# Altium PCB STM32F4_BerkwareDevBoard.PcbDoc
Units mm, origin at the board's own origin, x right, y up, seen from the top; angles counter-clockwise.
Board outline 36.4 x 56.4 mm, 4 copper layers (Top Layer, Int1 (GND), Int2 (PWR), Bottom Layer), stack 1.586 mm thick; 46 components, 47 nets, 211 pads, 266 vias.
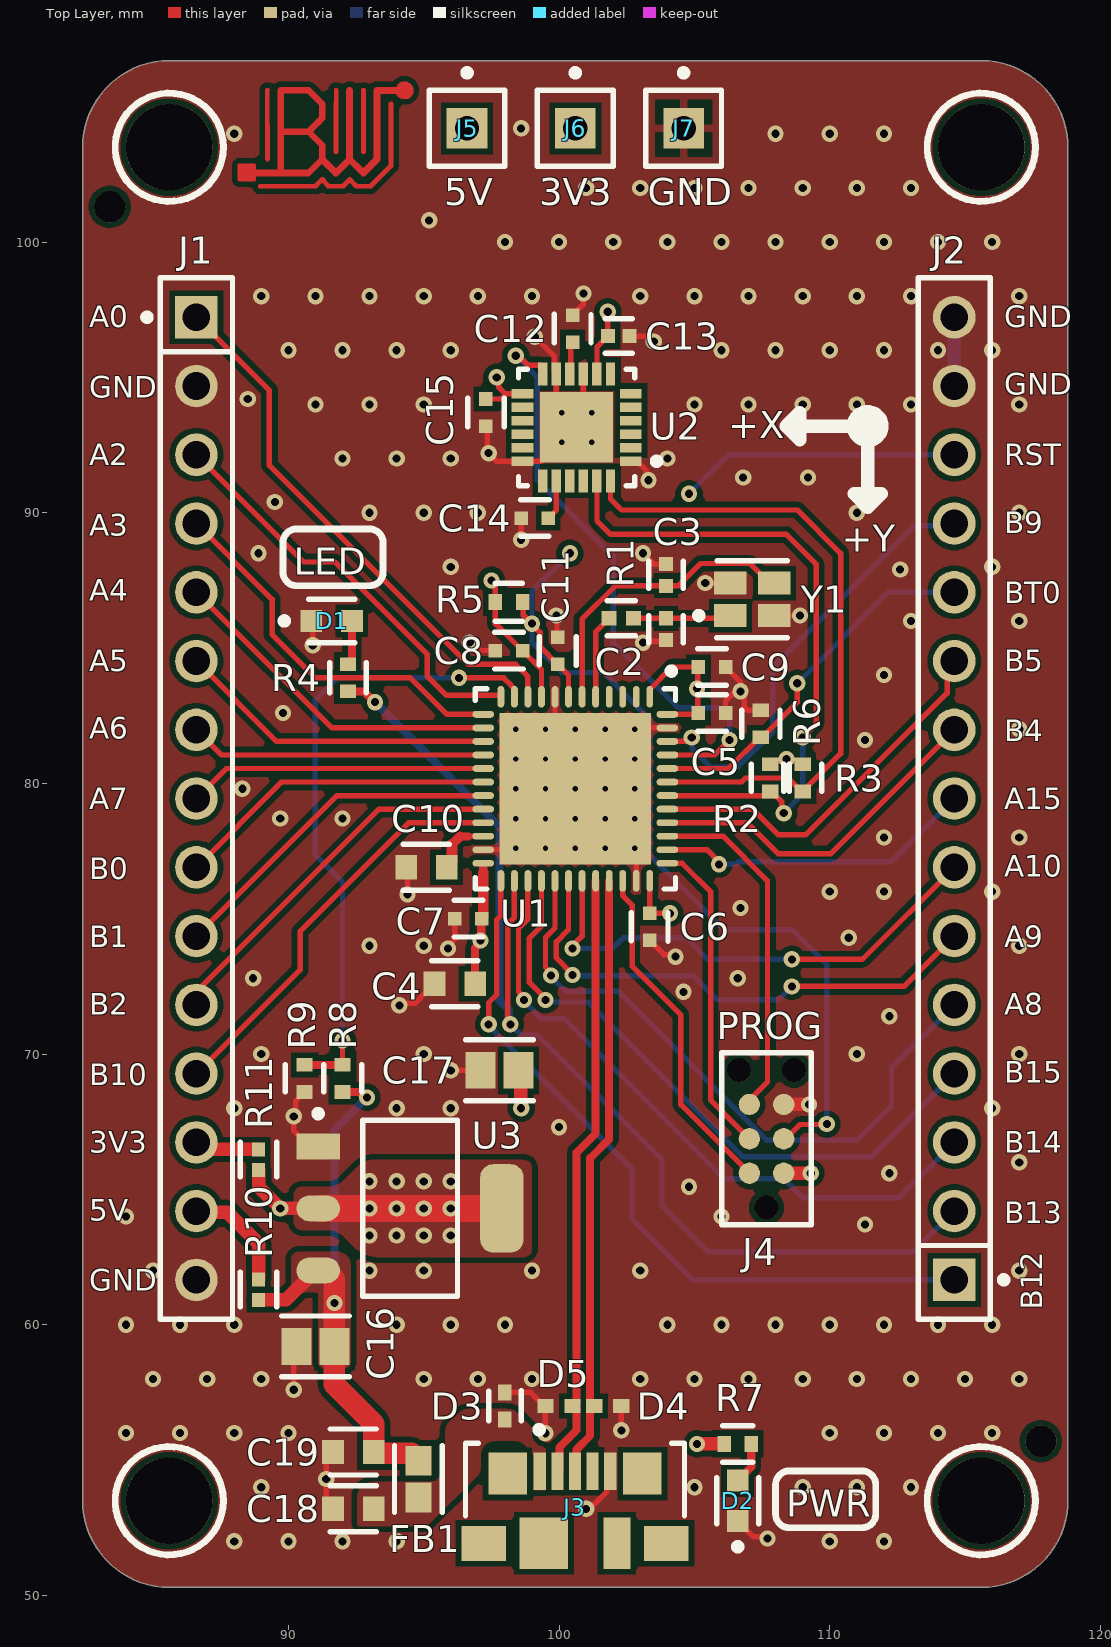
[diagram p0: Top Layer view]
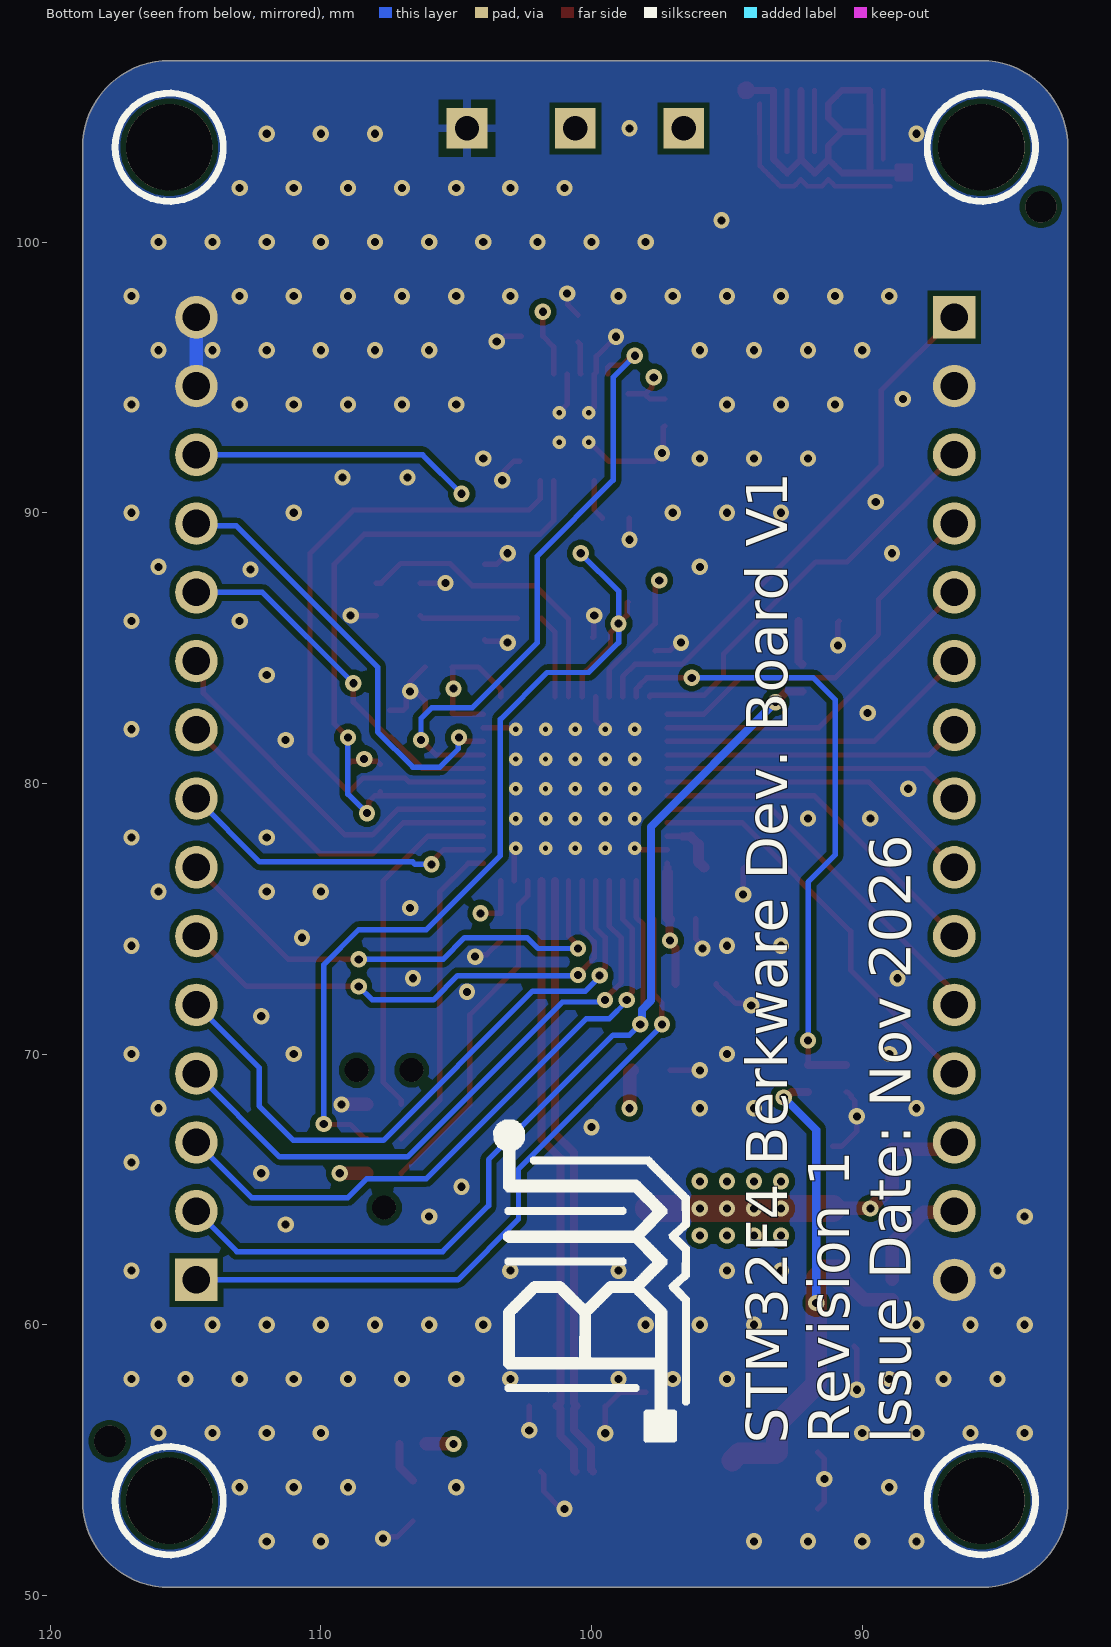
[diagram p1: Bottom Layer view, seen from below]
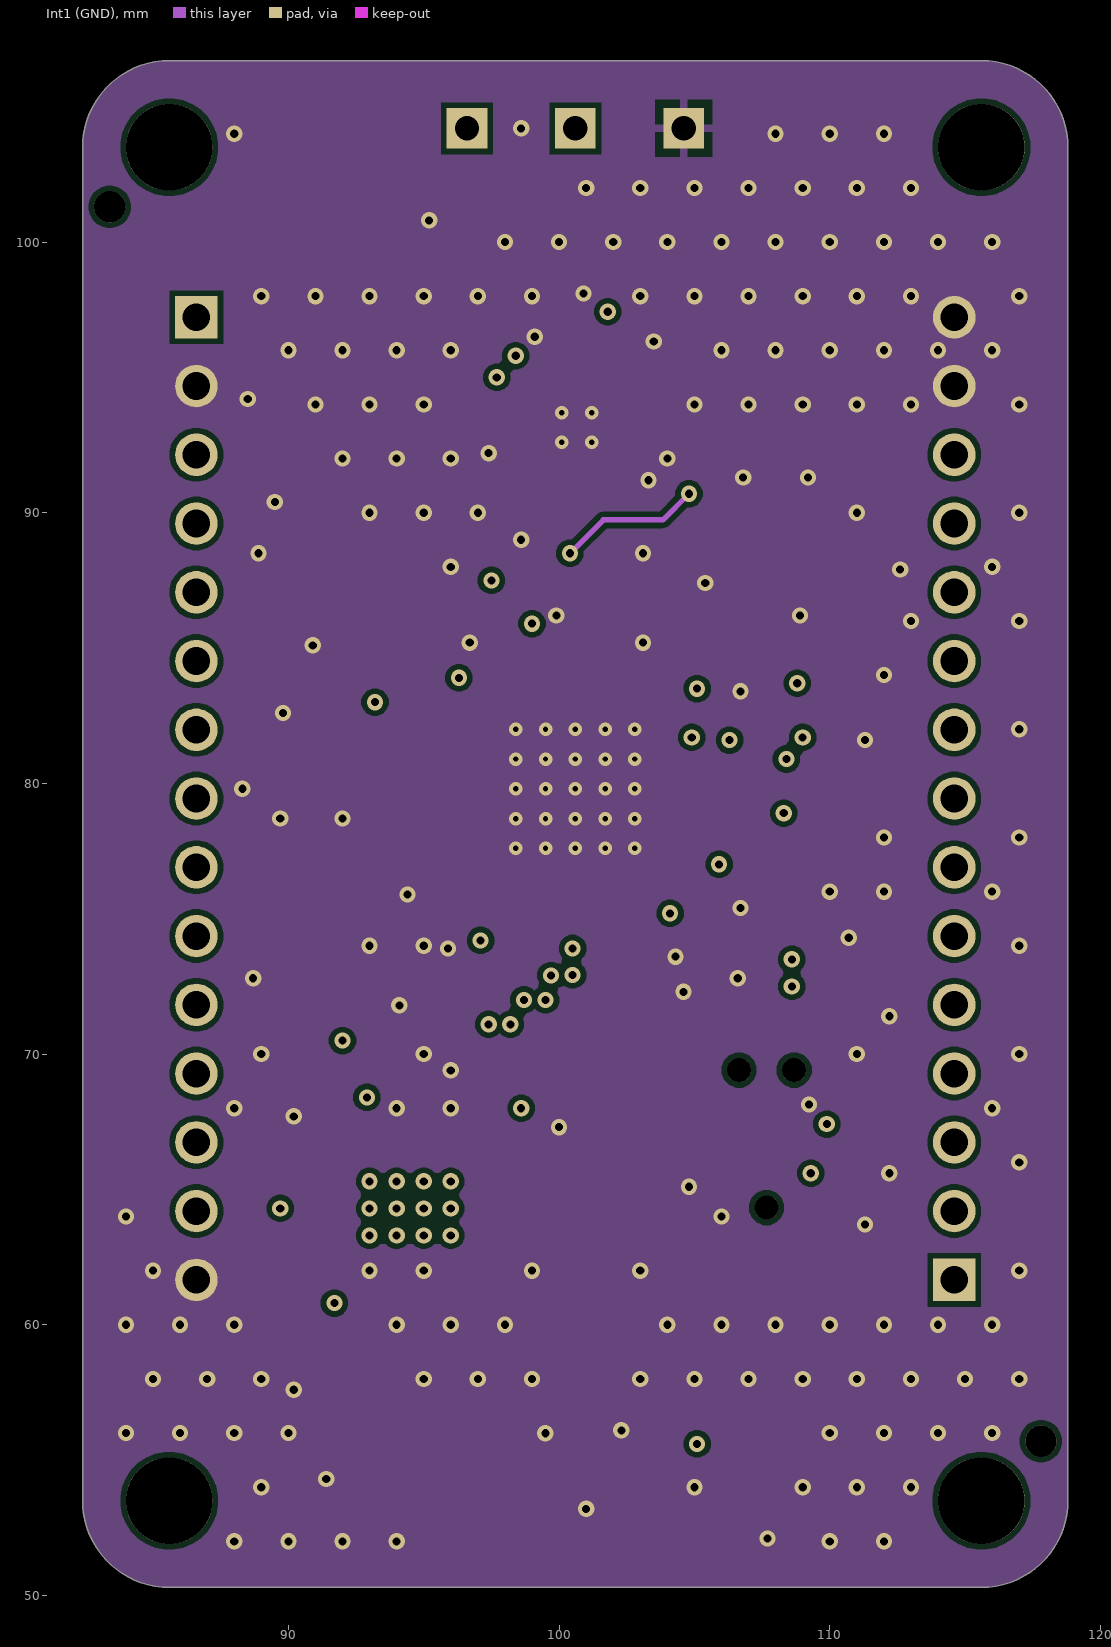
[diagram p2: Int1 (GND)]
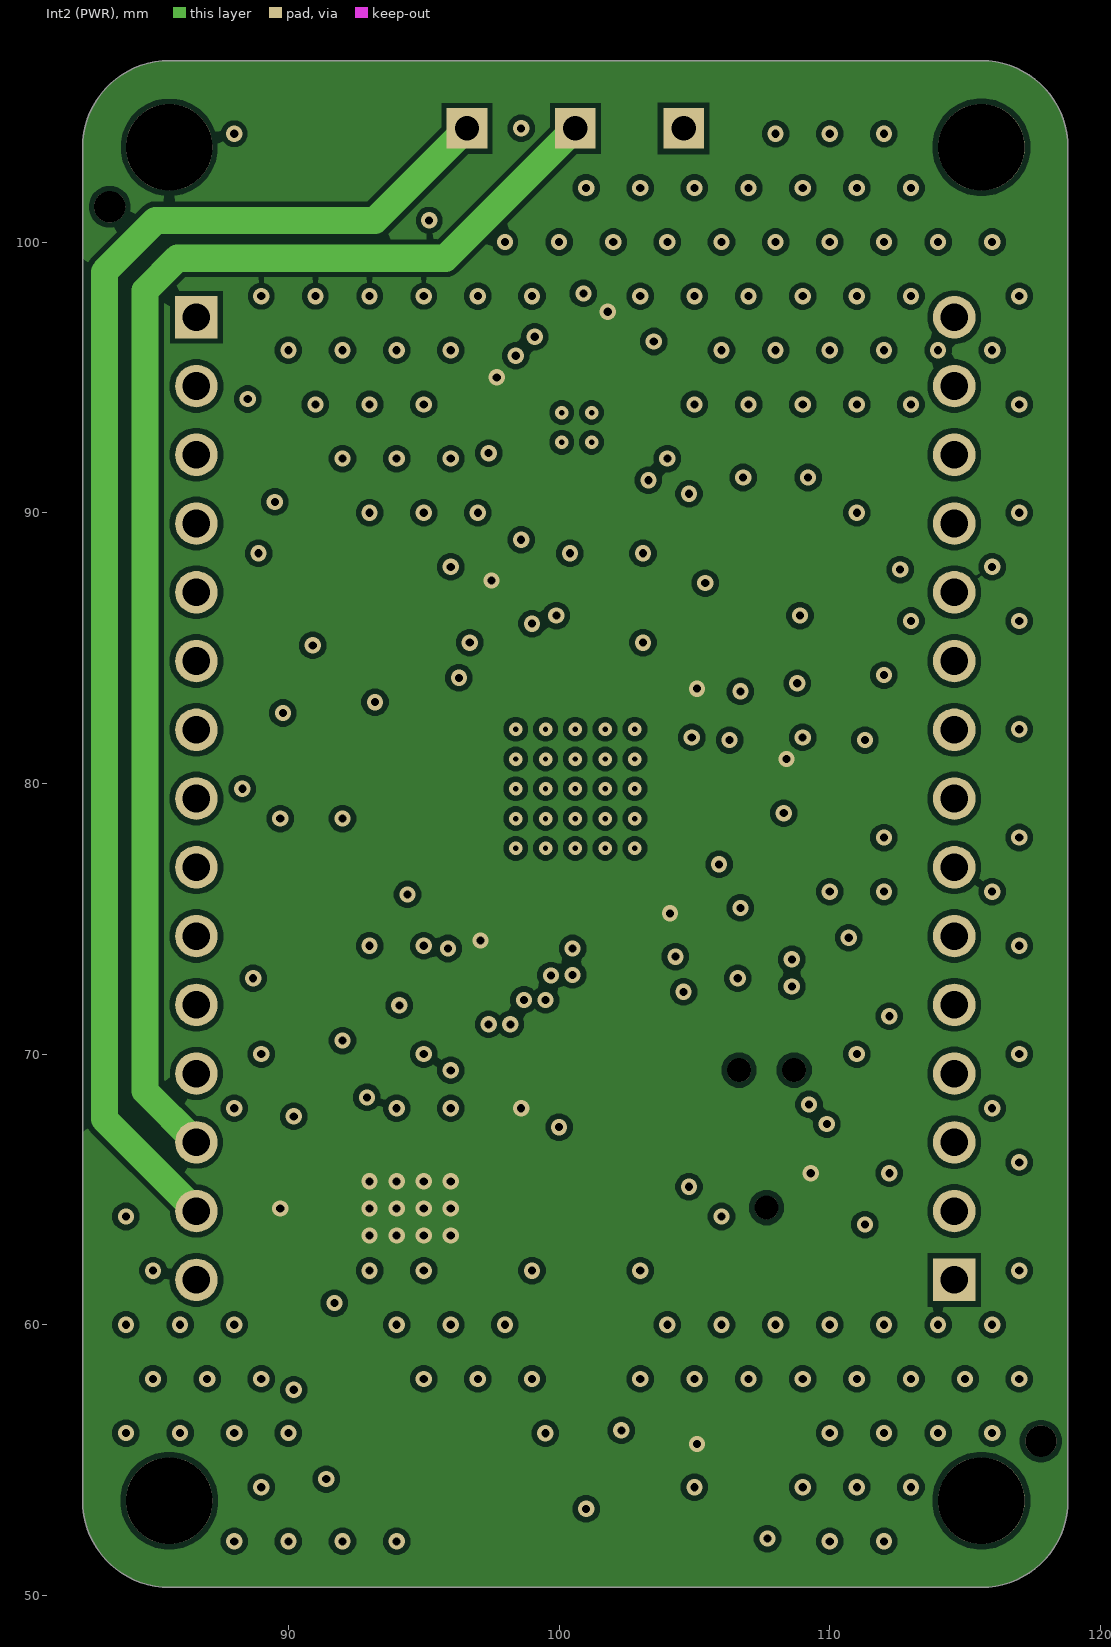
[diagram p3: Int2 (PWR)]
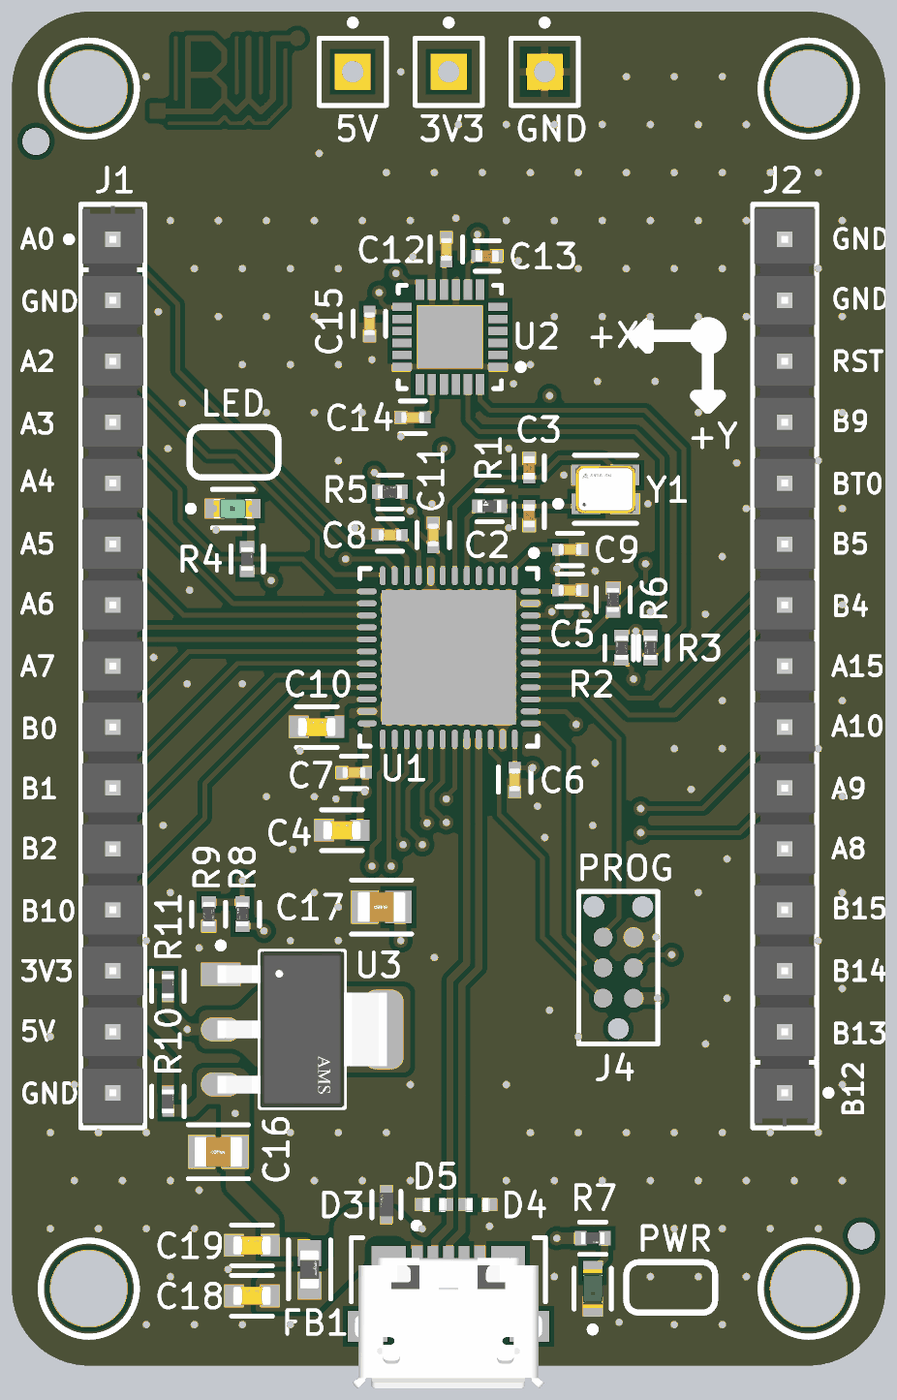
[diagram p4: 3D render of the assembled board from above, using the file's embedded part models]

## Layer stack, top to bottom
Top Solder: solder mask 0.0152, SM-001, Dk 3.8
Top Layer: signal copper 0.035
Dielectric 1: prepreg 0.2104, PP-017, Dk 4.4
Int1 (GND): signal copper 0.0152
Dielectric 3: core 1.065, Core-039, Dk 4.36
Int2 (PWR): signal copper 0.0152
Dielectric 5: prepreg 0.2104, PP-017, Dk 4.4
Bottom Layer: signal copper 0.035
Bottom Solder: solder mask 0.0152, SM-001, Dk 3.8

## Board outline
82.4,53.5 82.4,103.5 cw(c85.6,103.5) 85.6,106.7 115.6,106.7 cw(c115.6,103.5) 118.8,103.5 118.8,53.5 cw(c115.6,53.5) 115.6,50.3 85.6,50.3 cw(c85.6,53.5)

## Design rules (kind name [scope] priority, off if disabled: settings)
Clearance [All] p1: gap=0.2 ignorepadtopadclearanceinfootprint=FALSE except(0.15: Arc-SMDPad Track-SMDPad SMDPad-SMDPad)
DiffPairsRouting [All] p1: maxlimit=0.254 minlimit=0.203 mostfreqgap=0.254 toplayer_maxgap=0.203 toplayer_prefgap=0.203 toplayer_minwidth=0.295 toplayer_maxwidth=0.295 toplayer_prefwidth=0.295 bottomlayer_maxgap=0.203 bottomlayer_prefgap=0.203 bottomlayer_minwidth=0.295 bottomlayer_maxwidth=0.295 bottomlayer_prefwidth=0.295 impedanceprofiledriven=TRUE impedanceprofileid={2444CA07-7F8D-4011-84EC-3CE0FE22C272} impedanceprofilevalue=90.000000 maxuncoupledlength=12.7
HoleSize [All] p1: absolutevalues=TRUE maxlimit=6 minlimit=0.2 maxpercent=80.000 minpercent=20.000
MinimumSolderMaskSliver [All] p1: minsoldermaskwidth=0.1
PolygonConnect ThermalRelief_SelectedPads [IsPad And InComponent('J7')] p1: connectstyle=Relief reliefconductorwidth=0.3 reliefentries=4 polygonreliefangle="90 Angle" airgapwidth=0.3
PolygonConnect [All] p2: connectstyle=Direct reliefconductorwidth=0.254 reliefentries=4 polygonreliefangle="90 Angle" airgapwidth=0.254
RoutingVias [All] p1: holewidth=0.3 width=0.6 viastyle="Through Hole" minholewidth=0.2 minwidth=0.45 maxholewidth=0.8 maxwidth=0.8
SilkToSolderMaskClearance [IsPad] p1: minsilkscreentomaskgap=0.15 clearancetoexposedcopper=TRUE
SolderMaskExpansion [All] p1: expansion=0.025 istentingtop=FALSE
SupplyNets "Schematic Supply Nets_5" [InNet('+5VEXT')] p1: voltage=0.000
SupplyNets "Schematic Supply Nets_4" [InNet('+3V3EXT')] p2: voltage=0.000
SupplyNets "Schematic Supply Nets_3" [InNet('+5V')] p3: voltage=0.000
SupplyNets "Schematic Supply Nets_2" [InNet('+3V3')] p4: voltage=0.000
SupplyNets "Schematic Supply Nets_1" [InNet('VBUS')] p5: voltage=0.000
SupplyNets "Schematic Supply Nets" [InNet('GND')] p6: voltage=0.000
UnRoutedNet [All] p1: checkbadconnections=TRUE
Width [All] p1: maxlimit=1 minlimit=0.2 preferedwidth=0.5 toplayer_prefwidth=0.3 bottomlayer_prefwidth=0.3 minimp=50.000000 maximp=50.000000 favimp=50.000000
25 further rules are at their usual default settings.

## Classes and differential pairs
differential pair class DIFF_USB: USB_D
differential pair USB_D: +USB_D_P -USB_D_N

## Components (designator, comment, footprint, x,y, rotation, side; value= is the part's Value field where it differs from the comment)
C2 "10pF" FP-C0402-BB-MFG 103.95,85.7 r270 top value="10 pF"
C3 "10pF" FP-C0402-BB-MFG 103.95,87.7 r90 top value="10 pF"
C4 "2.2uF" FP-CC0603-DA-MFG 96.15,72.6 r180 top value="2.2 uF"
C5 "0.1uF" FP-CC0402-MFG 105.65,82.6 r0 top value="100 nF"
C6 "0.1uF" FP-CC0402-MFG 103.35,74.7 r270 top value="100 nF"
C7 "0.1uF" FP-CC0402-MFG 96.65,75 r180 top value="100 nF"
C8 "0.1uF" FP-CC0402-MFG 98.15,84.9 r180 top value="100 nF"
C9 "0.1uF" FP-CC0402-MFG 105.65,84.3 r0 top value="100 nF"
C10 "2.2uF" FP-CC0603-DA-MFG 95.1,76.9 r180 top value="2.2 uF"
C11 "0.1uF" FP-CC0402-MFG 99.95,84.9 r90 top value="100 nF"
C12 "0.1uF" FP-CC0402-MFG 100.5,96.8 r90 top value="100 nF"
C13 "10nF" FP-C0402-BB-MFG 102.2,96.525 r0 top value="10,000 pF"
C14 "2.2nF" FP-CC0402-MFG 99.1,89.8 r180 top value="2.2 nF"
C15 "0.1uF" FP-CC0402-MFG 97.3,93.7 r270 top value="100 nF"
C16 "22uF" FP-CC0805-0_2-1_45-IPC_C 91,59.2 r180 top
C17 "22uF" FP-CC0805-0_2-1_45-IPC_C 97.801,69.4 r180 top
C18 "2.2uF" FP-CC0603-DA-MFG 92.4,53.2 r180 top value="2.2 uF"
C19 "2.2uF" FP-CC0603-DA-MFG 92.4,55.3 r180 top value="2.2 uF"
D1 "USER_LED" FP-LTST-C191TBKT-MFG 91.6,86 r0 top
D2 "LTST-C193KGKT-5A" FP-LTST-C193KGKT-5A-MFG 106.6,53.5 r90 top
D3 "TPD1E10B06DPYR" FP-DPY0002A-MFG 98,57 r270 top
D4 "ESD321DPYR" FP-DPY0002A-MFG 101.8,57 r0 top value=0.9pF
D5 "ESD321DPYR" FP-DPY0002A-MFG 100,57 r180 top value=0.9pF
FB1 "BLM18BB600SN1D" FP-BLM18-0_15-t0_8-IPC_B 94.8,54.3 r90 top
J1 "TSW-115-23-T-S" FP-TSW-115-23-T-S-MFG 86.6,79.44 r270 top
J2 "TSW-115-23-T-S" FP-TSW-115-23-T-S-MFG 114.6,79.44 r90 top
J3 "473460001" FP-473460001-MFG 100.588,52.275 r0 top
J4 "ICSP" TC2030-MCP-NL 107.665,64.33 r90 top
J5 "Socket" PIN1 96.6,104.2 r0 top
J6 "Socket" PIN1 100.6,104.2 r0 top
J7 "Socket" PIN1 104.6,104.2 r0 top
R1 "0R" FP-MCS0402-MFG 102.3,86.1 r180 top
R2 "2.2k" FP-RT0402-MFG 107.8,80.2 r90 top value=2.2KΩ
R3 "2.2k" FP-RT0402-MFG 109,80.2 r90 top value=2.2KΩ
R4 "1k" FP-AT0402-MFG 92.2,83.9 r90 top
R5 "10k" FP-RT0402-MFG 98.15,86.7 r0 top value=10KΩ
R6 "10k" FP-RT0402-MFG 107.45,82.2 r90 top value=10KΩ
R7 "1k" FP-AT0402-MFG 106.6,55.6 r0 top
R8 "10k" FP-RT0402-MFG 92,69.1 r90 top value=10KΩ
R9 "10k" FP-RT0402-MFG 90.6,69.1 r270 top value=10KΩ
R10 "10R" FP-AC0402-IPC_C 88.9,61.3 r90 top
R11 "10R" FP-AC0402-IPC_C 88.9,66.1 r90 top
U1 "STM32F411CEU6" STM-UFQFPN48_L 100.6,79.8 r270 top
U2 "MPU-6050" IS-QFN-24_V 100.65,93.15 r180 top
U3 "AMS1117-3.3" FP-AMS1117-IPC_A 94.495,64.3 r0 top
Y1 "24MHz Crystal OSC" FP-ABM10W-MFG 107.137,86.8 r0 top

## Footprints (in the part's own frame and the unit in brackets; to place one, negate y for a bottom-side part, rotate by r counter-clockwise, add the part's x,y. Pads: shape width x height; smd on the part's side, far side on the other; paste and mask are expansions set on the pad)
FP-473460001-MFG [mm]
  rect 0.45x1.38 smd paste+0: 1(-1.3,2.31) 2(-0.65,2.31) 3(0,2.31) 4(0.65,2.31) 5(1.3,2.31)
  rect 1.425x1.55 smd paste+0: 6(-2.488,2.225) 7(2.488,2.225)
  rect 1.65x1.3 smd paste+0: 8(-3.375,-0.35) 11(3.375,-0.35)
  rect 1.8x1.9 smd paste+0: 9(-1.15,-0.35)
  rect 1x1.9 smd paste+0: 10(1.55,-0.35)
  silkscreen extent -4.05,0.67 4.05,3.97, body extent -4.3,-2.48 4.3,3.45, height 0.25
FP-ABM10W-MFG [mm]
  rect 1.2x0.85 smd paste+0: 1(-0.813,-0.6) 2(0.813,-0.6) 3(0.813,0.6) 4(-0.813,0.6)
  silkscreen extent -2.1,-1.42 1.3,1.43, body extent -1.51,-1.15 1.51,1.15, height 0.25
FP-AC0402-IPC_C [mm]
  rect 0.515x0.472 smd paste+0: 1(-0.379,0) 2(0.379,0)
  silkscreen extent -0.64,-0.67 0.64,0.67, body extent -0.74,-0.38 0.74,0.38, height 0.25
FP-AMS1117-IPC_A [mm]
  rect 1.604x0.952 smd paste+0: 1(-3.395,2.29)
  rrect100% 1.604x0.952 smd paste+0: 2(-3.395,0) 3(-3.395,-2.29)
  rrect59% 1.604x3.262 smd paste+0: 4(3.395,0)
  silkscreen extent -3.52,-3.25 1.75,3.62, body extent -4.7,-3.75 4.7,3.75, height 0.25
FP-AT0402-MFG [mm]
  rect 0.5x0.6 smd paste+0: 1(-0.5,0) 2(0.5,0)
  silkscreen extent -0.55,-0.67 0.55,0.67, body extent -0.85,-0.4 0.85,0.4, height 0.25
FP-BLM18-0_15-t0_8-IPC_B [mm]
  rect 1.106x0.958 smd paste+0: 1(-0.676,0) 2(0.676,0)
  silkscreen extent -1.23,-0.88 1.23,0.88, body extent -1.48,-0.73 1.48,0.73, height 0.25
FP-C0402-BB-MFG [mm]
  rect 0.52x0.52 smd paste+0: 1(-0.4,0) 2(0.4,0)
  silkscreen extent -0.5,-0.64 0.5,0.63, body extent -0.8,-0.4 0.8,0.4, height 0.25
FP-CC0402-MFG [mm]
  rect 0.5x0.5 smd paste+0: 1(-0.5,0) 2(0.5,0)
  silkscreen extent -0.53,-0.68 0.53,0.67, body extent -0.87,-0.48 0.87,0.48, height 0.25
FP-CC0603-DA-MFG [mm]
  rect 0.8x0.9 smd paste+0: 1(-0.75,0) 2(0.75,0)
  silkscreen extent -0.85,-0.85 0.85,0.85, body extent -1.35,-0.75 1.35,0.75, height 0.25
FP-CC0805-0_2-1_45-IPC_C [mm]
  rect 1.105x1.356 smd paste+0: 1(-0.701,0) 2(0.701,0)
  silkscreen extent -1.25,-1.12 1.25,1.12, body extent -1.35,-0.82 1.35,0.82, height 0.25
FP-DPY0002A-MFG [mm]
  rect 0.6x0.5 smd paste+0: 1(-0.5,0) 2(0.5,0)
  silkscreen extent -0.56,-0.6 0.55,0.6, body extent -0.9,-0.45 0.9,0.45, height 0.25
FP-LTST-C191TBKT-MFG [mm]
  rect 0.8x0.8 smd paste+0: 1(-0.75,0) 2(0.75,0)
  silkscreen extent -1.87,-0.8 0.85,0.8, body extent -1.25,-0.55 1.25,0.55, height 0.25
FP-LTST-C193KGKT-5A-MFG [mm]
  rect 0.8x0.8 smd paste+0: 1(-0.75,0) 2(0.75,0)
  silkscreen extent -1.82,-0.77 0.85,0.77, body extent -1.25,-0.55 1.25,0.55, height 0.25
FP-MCS0402-MFG [mm]
  rect 0.55x0.55 smd paste+0: 1(-0.45,0) 2(0.45,0)
  silkscreen extent -0.53,-0.65 0.53,0.65, body extent -0.82,-0.38 0.82,0.38, height 0.25
FP-RT0402-MFG [mm]
  rect 0.5x0.6 smd paste+0: 1(-0.5,0) 2(0.5,0)
  silkscreen extent -0.5,-0.71 0.5,0.7, body extent -0.85,-0.4 0.85,0.4, height 0.25
FP-TSW-115-23-T-S-MFG [mm]
  rect 1.57x1.57 hole 1.02 paste-2539.97: 1(-17.78,0)
  round 1.57 hole 1.02 paste-2539.97: 2(-15.24,0) 3(-12.7,0) 4(-10.16,0) 5(-7.62,0) 6(-5.08,0) 7(-2.54,0) 8(0,0) 9(2.54,0) 10(5.08,0) 11(7.62,0) 12(10.16,0) 13(12.7,0) 14(15.24,0) 15(17.78,0)
  silkscreen extent -19.24,-1.95 19.24,1.34, body extent -19.34,-1.44 19.34,1.44, height 0.25
IS-QFN-24_V [mm] "QFN, 24-Leads, Body 4x4mm, Pitch 0.5mm, Thermal Pad 2.7x2.6mm"
  rect 0.8x0.35 smd: 1(-2,1.25) 2(-2,0.75) 3(-2,0.25) 4(-2,-0.25) 5(-2,-0.75) 6(-2,-1.25) 13(2,-1.25) 14(2,-0.75) 15(2,-0.25) 16(2,0.25) 17(2,0.75) 18(2,1.25)
  rect 0.35x0.85 smd: 7(-1.25,-1.975) 8(-0.75,-1.975) 9(-0.25,-1.975) 10(0.25,-1.975) 11(0.75,-1.975) 12(1.25,-1.975) 19(1.25,1.975) 20(0.75,1.975) 21(0.25,1.975) 22(-0.25,1.975) 23(-0.75,1.975) 24(-1.25,1.975)
  rect 2.7x2.6 smd: 25(0,0)
  silkscreen extent -3.08,-2.15 2.15,2.15, body extent -2,-2 2,2, height 0.95
PIN1 [mm] "Connector; Plug"
  rect 1.5x1.5 hole 0.9: 1(0,0)
  silkscreen extent -1.4,-1.4 1.4,2.17
STM-UFQFPN48_L [mm] "QFN, 48-Leads, Body 7.1x7.1mm, Pitch 0.5mm, Thermal Pad 5.6x5.6mm, IPC High Density"
  oval 0.8x0.25 smd: 1(-3.4,2.75) 2(-3.4,2.25) 3(-3.4,1.75) 4(-3.4,1.25) 5(-3.4,0.75) 6(-3.4,0.25) 7(-3.4,-0.25) 8(-3.4,-0.75) 9(-3.4,-1.25) 10(-3.4,-1.75) 11(-3.4,-2.25) 12(-3.4,-2.75) 25(3.4,-2.75) 26(3.4,-2.25) 27(3.4,-1.75) 28(3.4,-1.25) 29(3.4,-0.75) 30(3.4,-0.25) 31(3.4,0.25) 32(3.4,0.75) 33(3.4,1.25) 34(3.4,1.75) 35(3.4,2.25) 36(3.4,2.75)
  oval 0.25x0.8 smd: 13(-2.75,-3.4) 14(-2.25,-3.4) 15(-1.75,-3.4) 16(-1.25,-3.4) 17(-0.75,-3.4) 18(-0.25,-3.4) 19(0.25,-3.4) 20(0.75,-3.4) 21(1.25,-3.4) 22(1.75,-3.4) 23(2.25,-3.4) 24(2.75,-3.4) 37(2.75,3.4) 38(2.25,3.4) 39(1.75,3.4) 40(1.25,3.4) 41(0.75,3.4) 42(0.25,3.4) 43(-0.25,3.4) 44(-0.75,3.4) 45(-1.25,3.4) 46(-1.75,3.4) 47(-2.25,3.4) 48(-2.75,3.4)
  rect 5.6x5.6 smd: 49(0,0)
  silkscreen extent -4.47,-3.7 3.7,3.7, body extent -3.55,-3.55 3.55,3.55, height 0.6
TC2030-MCP-NL [mil]
  round 31 smd: 1(50,-25) 2(50,25) 3(100,-25) 4(100,25) 5(150,-25) 6(150,25)
  round 34 hole 35 unplated: A(0,0) B(200,40) C(200,-40)
  silkscreen extent -25,-65 225,65

## Part data
C2 C3: library part CMP-03020-018108-1, "C0402 10 pF X7R 10.00% 16 V", Capacitance="10 pF", Manufacturer=Kemet, Manufacturer Part Number=C0402C100K4RACAUTO, Package=C0402-BB, Temperature="-55°C to +125°C", Temperature Characteristic=X7R, Temperature Coefficient=15%, Temperature Range High=+125°C, Temperature Range Low=-55°C, Tolerance=0.1, Voltage Rating="16 V", Automotive=No, Category=Cap, ComponentLink2Description=Datasheet, ComponentLink2URL=https://content.kemet.com/datasheets/KEM_C1002_X7R_SMD.pdf, Device Class L1="Passive Components", Device Class L2=Capacitors, Device Class L3="Ceramic Capacitors", Height=0.55mm, Ipc Land Pattern Name=CAPC10050X50, Lead Free=Yes, Material=Ceramic, Octopart=https://octopart.com/c0402c100k4racauto-kemet-91893731, RoHS=TRUE
C4 C10 C18 C19: library part CMP-03422-000148-1, "CAP CER 2.2UF 10V X7R 0603", Capacitance="2.2 uF", Manufacturer=YAGEO, Manufacturer Part Number=CC0603KRX7R6BB225, Package=CC0603-DA, Temperature="-55°C to +125°C", Temperature Characteristic=X7R, Temperature Coefficient=15%, Temperature Range High=+125°C, Temperature Range Low=-55°C, Tolerance=0.1, Voltage="10 V", Automotive=No, Category=Cap, ComponentLink2Description=Datasheet, ComponentLink2URL=http://www.yageo.com/documents/recent/UPY-GPHC_X7R_6.3V-to-50V_18.pdf, Device Class L1="Passive Components", Device Class L2=Capacitors, Device Class L3="Ceramic Capacitors", Digikey Description="CAP CER 2.2UF 10V X7R 0603", Footprint Url=http://www.yageo.com/exep/pages/download/literatures/UPY-C_GEN_24.pdf, Height=0.9mm, Lead Free=Yes, Material=Ceramic, Mouser Description="Multilayer Ceramic Capacitors MLCC - SMD/SMT 2.2uF 10V X7R 10%", Octopart=https://octopart.com/cc0603krx7r6bb225-yageo-20649696, RoHS=TRUE, Voltage Rating="10 V"
C5 C6 C7 C8 C9 C11 C12 C15: library part CMP-03422-001121-1, "CAP CER 0.1UF 16V X7R 0402", Capacitance="100 nF", Manufacturer=YAGEO, Manufacturer Part Number=CC0402KPX7R7BB104, Package=CC0402, Temperature="-55°C to +125°C", Temperature Characteristic=X7R, Temperature Coefficient=30ppm/°C, Temperature Range High=+125°C, Temperature Range Low=-55°C, Tolerance=0.1, Voltage Rating="16 V", Automotive=No, Automotive Grade=NA, Category=Cap, ComponentLink2Description=Datasheet, ComponentLink2URL=http://www.yageo.com/documents/recent/UPY-GP_NP0_16V-to-50V_16.pdf, Device Class L1="Passive Components", Device Class L2=Capacitors, Device Class L3="Ceramic Capacitors", Digikey Description="CAP CER 0.1UF 16V X7R 0402", Footprint Url=http://www.yageo.com/exep/pages/download/literatures/UPY-C_GEN_24.pdf, Height=0.55mm, Ipc Land Pattern Name=CAPC10050X50, Lead Free=Yes, Material=Ceramic, Mouser Description="0402 0.1 uF 16 V ±10% Tolerance X7R SMT Multilayer Ceramic Capacitor", Octopart=https://octopart.com/cc0402kpx7r7bb104-yageo-21548559, RoHS=TRUE
C13: library part CMP-2008-02186-2, "CAP CER 10000PF 50V X7R 0402", Capacitance="10,000 pF", Manufacturer=Kemet, Manufacturer Part Number=C0402C103K5RACAUTO, Package=C0402-BB, Temperature="-55°C to +125°C", Temperature Characteristic=X7R, Temperature Coefficient=15%, Temperature Range High=+125°C, Temperature Range Low=-55°C, Tolerance=0.1, Voltage Rating="50 V", Automotive=No, Category=Cap, ComponentLink2Description=Datasheet, ComponentLink2URL=https://content.kemet.com/datasheets/KEM_C1002_X7R_SMD.pdf, Device Class L1="Passive Components", Device Class L2=Capacitors, Device Class L3="Ceramic Capacitors", Digikey Description="CAP CER 10000PF 50V X7R 0402", Height=0.55mm, Ipc Land Pattern Name=CAPC10050X50, Lead Free=Yes, Material=Ceramic, Mouser Description="Cap Ceramic 0.01uF 50V X7R 10% Pad SMD 0402 125C Automotive T/R", Octopart=https://octopart.com/c0402c103k5racauto-kemet-22884290, RoHS=TRUE
C14: library part CMP-03422-000888-1, "CAP CER 2200PF 10V X7R 0402", Capacitance="2.2 nF", Manufacturer=YAGEO, Manufacturer Part Number=CC0402KRX7R6BB222, Package=CC0402, Temperature="-55°C to +125°C", Temperature Characteristic=X7R, Temperature Coefficient=30ppm/°C, Temperature Range High=+125°C, Temperature Range Low=-55°C, Tolerance=0.1, Voltage Rating="10 V", Automotive=No, Automotive Grade=NA, Category=Cap, ComponentLink2Description=Datasheet, ComponentLink2URL=http://www.yageo.com/documents/recent/UPY-GP_NP0_16V-to-50V_16.pdf, Device Class L1="Passive Components", Device Class L2=Capacitors, Device Class L3="Ceramic Capacitors", Digikey Description="CAP CER 2200PF 10V X7R 0402", Footprint Url=http://www.yageo.com/exep/pages/download/literatures/UPY-C_GEN_24.pdf, Height=0.55mm, Ipc Land Pattern Name=CAPC10050X50, Lead Free=Yes, Material=Ceramic, Octopart=https://octopart.com/cc0402krx7r6bb222-yageo-71334368, RoHS=TRUE
C16 C17: library part CMP-03422-001497-1, "CAP CER 22UF 25V X5R 0805", Case Code (Imperial)=0805, Case Code (Metric)=2012, Dielectric=X5R, Max Operating Temperature=85°C, Min Operating Temperature=-55°C, Package Quantity=3000, Tolerance=20%, Voltage Rating=25V, Capacitance=22uF, Case/Package=0805, Halogen Free="Halogen Free", Height=1.25mm, Lead Free="Lead Free", Length=0.079inch, Mount="Surface Mount", Packaging="Tape and Reel", RoHS Compliant=Yes, Termination=SMD/SMT, Thickness=0.057inch, Voltage Rating (DC)=25V, Weight=0.000194oz, Width=0.049inch
D1: library part CMP-22017-000008-1, "LED BLUE CLEAR CHIP SMD", Case Code (Imperial)=0603, Case Code (Metric)=1608, Color=Blue, Forward Current=20mA, Forward Voltage=3.8V, Lens Color=Colorless, Max Operating Temperature=80°C, Max Power Dissipation=75mW, Min Operating Temperature=-20°C, Package Quantity=1, Power Dissipation=76mW, Reverse Voltage=5V, Case/Package=0603, Depth=1.6mm, Dominant Wavelength=475nm, Height=0.55mm, Illumination Color=Blue, Lead Free="Lead Free", Length=0.8mm, Lens Style=Diffused, Lens Transparency=Clear, Luminous Intensity=180mcd, Mount="Surface Mount", Number of Elements=1, Number of LEDs=1, Number of Pins=2, Packaging="Tape and Reel", Radiation Hardening=No, Test Current=20mA, Viewing Angle=130°, Wavelength=468nm, Width=0.8mm
D2: library part CMP-2000-06622-2, "LED GREEN CLEAR CHIP SMD", Case Code (Imperial)=0603, Case Code (Metric)=1608, Color=Green, Forward Current=30mA, Forward Voltage=2.3V, Lens Color=Colorless, Max Operating Temperature=85°C, Min Operating Temperature=-55°C, Package Quantity=3000, Power Dissipation=75mW, Reverse Voltage=5V, Test Current=5mA, Case/Package=0603, Depth=0.8mm, Dominant Wavelength=576.5nm, Height=0.35mm, Illumination Color=Green, Lead Free="Lead Free", Length=1.6mm, Lens Style=Diffused, Lens Transparency=Clear, Luminous Intensity=28mcd, Mount="Surface Mount", Number of Elements=1, Number of LEDs=1, Number of Pins=2, Packaging="Tape and Reel", Power Rating=75mW, Radiation Hardening=No, Viewing Angle=130°, Width=0.8mm
D3: library part CMP-0326-00004-4, "TVS DIODE 5.5V 14V 2X1SON", Breakdown Voltage=6V, Capacitance=12pF, Case/Package=0402, Clamping Voltage=14V, Leakage Current=100nA, Max Operating Temperature=125°C, Min Operating Temperature=-40°C, Package Quantity=1, Peak Pulse Current=5A, Peak Pulse Power=90W, Power Line Protection=No, Reverse Standoff Voltage=5.5V, Test Current=1mA, Composition=Zener, Contact Plating=Gold, Direction=Bidirectional, Element Configuration=Single, ESD Protection=Yes, Height=0.35mm, Interface=GPIO, Lead Free="Lead Free", Length=1.1mm, Max Reverse Leakage Current=100nA, Min Breakdown Voltage=6V, Number of Bidirectional Channels=1, Number of Channels=1, Number of Pins=2, Packaging="Tape and Reel", Radiation Hardening=No, REACH SVHC="No SVHC", Width=0.7mm, Working Voltage=5.5V
D4 D5: library part CMP-04989-000001-1, "HDMI2.0 ESD PROTECTION", Ambient Temperature Range High=+125°C, Ambient Temperature Range Low=-40°C, Breakdown Voltage=4.5V, Capacitance=0.9pF, Clamping Voltage=6.8V, Manufacturer="Texas Instruments", Package=DPY0002A, Peak Pulse Current=6A, Peak Pulse Power=40W, Reverse Standoff Voltage=3.6V, Temperature="-40°C to +125°C", Automotive=No, Category=Diode, ComponentLink2Description=Datasheet, ComponentLink2URL=http://www.ti.com/lit/ds/symlink/esd321.pdf, Device Class L1="Circuit Protection", Device Class L2="TVS Diodes", Device Class L3=unset, Digikey Description="HDMI2.0 ESD PROTECTION", Direction=Unidirectional, Height=0.45mm, Lead Free=Yes, Manufacturer Part Number=ESD321DPYR, Number of Channels=1, Octopart=https://octopart.com/esd321dpyr-texas+instruments-94354200, RoHS=TRUE, Standoff Height=0mm, Temperature Range High=+125°C, Temperature Range Low=-40°C
FB1: library part CMP-0686-00415-3, "Chip Ferrite Bead, 0603, 60Ω @ 100MHz, 0.25Ω, 25%, 600mA", Case Code (Imperial)=0603, Case Code (Metric)=1608, Current Rating=550mA, DC Resistance (DCR)=250mR, Max Operating Temperature=125°C, Min Operating Temperature=-55°C, Package Quantity=1, Resistance=350mR, Test Frequency=100MHz, Tolerance=25%, Case/Package=0603, Core Material=Ferrite, DC Current=550mA, Depth=0.8mm, Height=0.8mm, Impedance=60R, Lead Free="Lead Free", Length=1.6mm, Material=Steel, Max Current Rating=550mA, Max DC Current=550mA, Military Standard=Not, Number of Circuits=1, Number of Lines=1, Number of Pins=2, Packaging="Tape and Reel", Radiation Hardening=No, REACH SVHC="No SVHC", RoHS Compliant=Yes, Series=BLM18B, Shielding=Unshielded, Termination=SMD/SMT, Width=0.8mm
J1 J2: library part CMP-02766-001466-1, "CONN HEADER VERT 15POS 2.54MM", Color=Black, Connector Type="Male Pin", Contact Material=Bronze, Contact Mating Length=0.23inch, Contact Plating=Tin, Contact Type="Male Pin", Gender=Male, Height=2.54mm, Housing Color=Black, Housing Material=Plastic, Lead Free="Lead Free", Length=38.1mm, Mount="Through Hole", Number of Contacts=15, Number of Positions=15, Number of Rows=1, Packaging=Bulk, Pitch=0.1inch, Radiation Hardening=No, REACH SVHC="No SVHC", RoHS Compliant=Yes, Series=TSW, Termination=Solder, Width=2.54mm
J3: library part CMP-2000-05246-2, "CONN RCPT USB2.0 MICRO B SMD R/A", Current Rating=1.8A, Manufacturer=Molex, Package=0, Temperature="-30°C to +85°C", Temperature Range High=+85°C, Temperature Range Low=-30°C, Voltage Rating=30V, Automotive=No, Category=Conn, ComponentLink2Description=Datasheet, ComponentLink2URL=https://www.molex.com/webdocs/datasheets/pdf/en-us/0473460001_IO_CONNECTORS.pdf, Conn Orientation="Right Angle", Contact Material=Gold,Nickel, Device Class L1=Connectors, Device Class L2="USB Connectors", Device Class L3=unset, Digikey Description="CONN RCPT USB2.0 MICRO B SMD R/A", Footprint Url=https://www.molex.com/pdm_docs/sd/473460001_sd.pdf, Height=2.945mm, Is Female=yes, Lead Free=Yes, Manufacturer Part Number=473460001, Number of Contacts=5, Octopart=https://octopart.com/47346-0001-molex-7164928, Pitch=0.65mm, RoHS=TRUE, Shielding=true, Usb Standard="USB 2.0"
R1: library part CMP-02407-001042-1, "RES SMD 1.2K OHM 1% 1/10W 0402", Case Code (Imperial)=0402, Case Code (Metric)=1005, Max Operating Temperature=125°C, Max Power Dissipation=100mW, Min Operating Temperature=-55°C, Package Quantity=1, Resistance=0mR, Voltage Rating=50V, Case/Package=0402, Composition="Thin Film", Contact Plating=Tin, Depth=0.5mm, Height=0.015inch, Lead Free="Lead Free", Length=1mm, Military Standard=Not, Mount="Surface Mount", Number of Terminations=2, Packaging="Tape and Reel", Power Rating=100mW, Radiation Hardening=No, REACH SVHC="No SVHC", Termination=Wraparound, Voltage Rating (DC)=50V, Width=0.02inch
R2 R3: library part CMP-03412-019720-1, "RES SMD 2.2K OHM 0.1% 1/16W 0402", Manufacturer=Yageo, Manufacturer Part Number=RT0402BRE072K2L, Package=RT0402, Power Rating=0.063W, Resistance=2.2KΩ, Temperature="-55°C to +155°C", Temperature Coefficient="50 ppm/°C", Temperature Range High=+155°C, Temperature Range Low=-55°C, Tolerance=0.001, Voltage Rating=50V, Automotive=No, Category=Res, ComponentLink2Description=Datasheet, ComponentLink2URL=http://www.yageo.com/documents/recent/PYu-RT_1-to-0.01_RoHS_L_9.pdf, Composition="Thin Film", Device Class L1="Passive Components", Device Class L2=Resistors, Device Class L3="Chip SMD Resistors", Digikey Description="RES SMD 2.2K OHM 0.1% 1/16W 0402", Footprint Url=http://www.yageo.com/exep/pages/download/literatures/PYu-R_Mount_10.pdf, Height=0.35mm, Ipc Land Pattern Name=RESC10050X30, Lead Free=Yes, Octopart=https://octopart.com/rt0402bre072k2l-yageo-1445889, RoHS=TRUE, Series=RT
R4 R7: library part CMP-03412-049230-1, "Thin Film Chip Resistors Automotive Grade 1kΩ 1% 25ppm/°C 0402"
R5 R6 R8 R9: library part CMP-2002-02973-2, "RES SMD 10K OHM 0.1% 1/16W 0402", Manufacturer=Yageo, Manufacturer Part Number=RT0402BRE0710KL, Package=RT0402, Power Rating=0.063W, Resistance=10KΩ, Temperature="-55°C to +155°C", Temperature Coefficient="50 ppm/°C", Temperature Range High=+155°C, Temperature Range Low=-55°C, Tolerance=0.001, Voltage Rating=50V, Automotive=No, Category=Res, ComponentLink2Description=Datasheet, ComponentLink2URL=http://www.yageo.com/documents/recent/PYu-RT_1-to-0.01_RoHS_L_9.pdf, Composition="Thin Film", Device Class L1="Passive Components", Device Class L2=Resistors, Device Class L3="Chip SMD Resistors", Digikey Description="RES SMD 10K OHM 0.1% 1/16W 0402", Footprint Url=http://www.yageo.com/exep/pages/download/literatures/PYu-R_Mount_10.pdf, Height=0.35mm, Ipc Land Pattern Name=RESC10050X30, Lead Free=Yes, Mouser Description="Res Thin Film 0402 10K Ohm 0.1% 1/16W ±50ppm/°C Molded SMD Paper T/R", Octopart=https://octopart.com/rt0402bre0710kl-yageo-1416557, RoHS=TRUE, Series=RT
R10 R11: library part CMP-03412-027111-2, "RES 10Ω ±1% 0.063W 0402", RoHS Compliant=Yes
U1: library part CMP-0243-00165-1, "ARM Cortex-M4 32-bit MCU+FPU, 512 KB Flash, 128 KB RAM, 36 I/Os, 48-Pin UFQFPN, -40 to 85 degC, Tray", I/Os (High Current)=36, Operating Frequency(F) (Processor speed) (MHz)=100, Package Description=UFQFPN48, Package Reference="48-Pin Ultra Thin Fine Pitch Quad Flat No-Lead, 7 x 7 x 0.6 mm Body, 0.5 mm Pitch, Exposed Pad", Supply Voltage(Vcc) min (V)=1.7, ComponentLink1Description="Manufacturer URL", ComponentLink1URL=http://www.st.com/, ComponentLink2Description=Datasheet, ComponentLink2URL=http://www.st.com/st-web-ui/static/active/en/resource/technical/document/datasheet/DM00115249.pdf, Core="ARM Cortex-M4", DatasheetVersion="Rev. 6", FLASH Size (Prog) (kB)=512, Internal RAM Size (kB)=128, Mounting Technology="Surface Mount", Packing=Tray
U2: library part CMP-1753-00002-2, "3-Axis Gyroscope, Accelerometer and a Digital Motion Processor(TM) (DMP), 2.375 to 3.46 V, -40 to 85 degC, 24-Pin QFN, RoHS, Tape and Reel", Manufacturer=InvenSense, Standard Package=5,000, Category=Sensors,Transducers, Datasheet URL=http://datasheet.octopart.com/MPU-6050-InvenSense-datasheet-14421344.pdf, Datasheet Version="Rev. 3.3, 05/2012", Dynamic Catalog=MPU-6000™Series, Family=Multifunction, Featured Product=MPU-60506-Axis,IntegratedI²CSolution, Manufacturer URL=http://www.invensense.com/, Online Catalog=MPU-6000™Series, Other Names="1428-1007-2 / MPU6050", Output Type=Digital, Sensor Type=MotionTracking, Unit PriceUSD=Digital
U3: library part CMP-209535-000001-1, "LDO Voltage Regulators 1A, 3.3V", Dropout Voltage=1.1V, Manufacturer="Advanced Monolithic Systems", Max Junction Temp=+125°C, Max Power Dissipation=1.2W, Max Supply Voltage=15V, Nominal Supply Current=5mA, Output Current=1A, Output Voltage=3.3V, Package=AMS1117, Temperature="-40°C to +125°C", Temperature Range Low=-40°C, Automotive=No, Category=IC, ComponentLink2Description=Datasheet, ComponentLink2URL=http://www.advanced-monolithic.com/pdf/ds1117.pdf, Device Class L1="Integrated Circuits (ICs)", Device Class L2="Power Management ICs", Device Class L3="Voltage Regulators - Linear", Height=1.8mm, Ipc Land Pattern Name=SOT229P700X180-4, Lead Free=Yes, Manufacturer Part Number=AMS1117-3.3, Number Of Outputs=1, Octopart=https://octopart.com/ams1117-3.3-advanced+monolithic+systems-25899300, Output Type=Fixed, RoHS=TRUE, Standoff Height=0.64mm, Temperature Range High=+125°C
Y1: library part CMP-27762-001102-1, "Crystal 24MHz ±20ppm 8pF SMD-4 2.5mm x 2mm"
J5 J6 J7: LatestRevisionDate=17-Jul-2002, LatestRevisionNote="Re-released for DXP Platform.", Publisher="Altium Limited"

## Free pads (board coordinates)
  round 3.2 hole 3.2 paste-2539.97: MH(85.6,53.5) MH(85.6,103.5) MH(115.6,103.5) MH(115.6,53.5)
  round 1.152 hole 1.152 unplated paste-2539.97: TH(83.4,101.3) TH(117.8,55.7)

## Via types
v1: diameter 0.6, hole 0.3, Top Layer to Bottom Layer, tented both sides, 237 vias
v2: diameter 0.5, hole 0.2, Top Layer to Bottom Layer, tented both sides, 29 vias

## Nets (pads, with @x,y where several pads share a name; then routed paths per layer and width w, separated by ;. In a path a pad name is that pad's centre, name@x,y a point inside that pad or via, vN(x,y) a via of type N, cw(c..) or ccw(c..) an arc to the next point about the centre after c; other vN are vias at no path point)
+3V3: C4.1 C5.1 C6.1 C7.1 C8.1 C9.1 C13.1 C15.1 C17.1 J4.1 R2.2 R3.2 R5.1 R7.1 R11.1 U1.1 U1.9 U1.24 U1.36 U1.48 U2.8 U2.13 U3.2 U3.4 | length 36.3
  Top Layer w0.2: 97.2,76.9 U1.24 ; C15.1 97.85,94.2 98.025,94.375 ; v1(97.5,87.5) 97.5,87.392 97.65,87.242 R5.1 97.65,85.9 C8.1 99.35,84.2 U1.9 ; v1(97.7,95) 97.774,94.926 97.774,94.626 98,94.4 U2.13 ; U2.8 101.4,96.125 C13.1 v1(101.8,97.425) ; U1.36 C6.1 v1(104.1,75.2) ; U1.1 103.35,83.475 104.175,84.3 C9.1 105.125,84.275 105.125,83.525 v1(105.1,83.5) 105.125,83.475 105.125,82.625 C5.1 105.1,82.55 U1.48 ; R2.2 107.923,80.823 108.323,80.823 v1(108.4,80.9) 108.477,80.823 108.877,80.823 R3.2
  Top Layer w0.3: C4.1 96.9,73.919 97.1,74.119 v1(97.1,74.2) 97.125,74.225 C7.1@97.125,74.975 ; 97.2,76.7 97.2,76.9
  Top Layer w0.4: C7.1@97.125,74.975 C7.1 97.2,75.05 97.2,75.3 97.2,76.7
  Top Layer w0.5: R11.1 88.9,65.1 v1(89.7,64.3) U3.2 ; C17.1 98.581,69.321 98.581,68.02 v1(98.6,68.001) ; v1(105.1,55.6) 105.146,55.6 R7.1 ; J4.1 v1(109.3,65.6)
  Top Layer w1: U3.2 v1(93,64.3) v1(94,64.3) v1(95,64.3) v1(96,64.3) U3.4
  other v1: 93,63.3 94,63.3 95,63.3 96,63.3 93,65.3 94,65.3 95,65.3 96,65.3
+3V3EXT: J1.13 J6.1 R11.2 | length 52.6
  Top Layer w0.5: J1.13@87.009,66.434 87.051,66.476 R11.2@88.886,66.476
  Top Layer w1: J1.13@86.6,66.7 J1.13
  Int2 (PWR) w1: J1.13 84.7,68.64 84.7,98.203 85.897,99.4 95.8,99.4 J6.1
+5V: C16.1 C19.1 FB1.2 R8.1 R10.1 U3.3 | length 21.3
  Top Layer w0.3: R8.1 92.619,68.6 92.819,68.4 v1(92.9,68.4)
  Top Layer w0.5: R10.1 89.914,60.921 90.687,61.695 90.687,61.801 U3.3@90.896,62.01
  Top Layer w0.8: U3.3@90.896,62.01 91.385,62.01 91.701,61.694 C16.1 91.701,57.799 93.15,56.35 C19.1 ; C19.1 93.2,55.25 94.546,55.25 94.8,54.996 FB1.2
  Bottom Layer w0.3: v1(91.7,60.8) 91.7,67.2 v1(92.9,68.4)
+5VEXT: J1.14 J5.1 R10.2 | length 55.8
  Top Layer w0.3: J1.14 J1.14@86.635,64.165
  Top Layer w0.5: J1.14@86.635,64.165 87.735,64.165 88.9,63 R10.2
  Int2 (PWR) w1: J1.14 83.2,67.6 83.2,98.9 85.1,100.8 93.2,100.8 J5.1
GND: C2.2 C3.2 C4.2 C5.2 C6.2 C7.2 C8.2 C9.2 C10.2 C11.2 C12.2 C13.2 C14.2 C15.2 C16.2 C17.2 C18.2 C19.2 D1.1 D2.1 D3.1 D4.2 D5.2 J1.2 J1.15 J2.14 J2.15 J3.5 J4.5 J7.1 R6.2 R9.2 U1.8 U1.23 U1.35 U1.47 U1.49 U2.1 U2.9 U2.11 U2.18 U2.25 U3.1 Y1.2 Y1.4 | length 51.2
  Top Layer w0.2: v1(90.2,57.6) 90.2,59.101 C16.2 ; R9.2 90.55,68.6 90.4,68.45 90.4,68.4 90.277,68.277 90.277,67.777 v1(90.2,67.7) 90.2,67.164 90.774,66.59 U3.1 ; D1.1 90.9,85.95 v1(90.9,85.1) ; C18.2 91.4,53.45 v1(91.4,54.3) 91.4,55.05 C19.2 ; v1(94.1,71.8) 94.177,71.877 94.677,71.877 95.05,72.25 95.1,72.25 95.4,72.55 C4.2 ; C10.2 94.4,76.85 v1(94.4,75.9) ; v1(95.9,73.9) 95.9,74.008 96.15,74.258 C7.2 ; v1(96,69.4) C17.2 ; v1(96.7,85.2) 96.808,85.2 97.1,84.908 97.642,84.908 C8.2 ; U1.23 98.35,77.55 v2(98.4,77.6) ; C15.2 97.35,93.15 97.35,92.25 v1(97.4,92.2) 97.7,91.9 U2.18 99.35,91.9 100.05,92.6 v2(100.1,92.6) ; D3.1 98.95,57.5 99.45,57 D5.2 99.493,56.993 v1(99.493,55.992) ; v1(98.6,89) C14.2 ; v1(99.1,96.5) 99.825,95.775 99.825,95.2 U2.11 99.9,93.9 v2(100.1,93.7) ; v2(99.5,82) 99.85,82.35 U1.8 ; v1(99.9,86.2) 99.925,86.175 99.925,85.425 C11.2 ; C12.2 100.887,97.687 100.887,98.087 v1(100.9,98.1) ; U2.9 100.9,94 v2(101.2,93.7) ; v1(101,53.2) 101.077,53.277 101.198,53.277 101.763,53.841 101.763,54.46 J3.5 ; v2(101.2,92.6) U2.25@101.25,92.6 ; v1(102.3,56.1) D4.2 ; C13.2 103.192,96.525 103.392,96.325 v1(103.5,96.325) ; U2.1 102.875,91.9 103.223,91.552 103.223,91.277 v1(103.3,91.2) ; v2(102.8,77.6) 102.85,77.55 U1.35 ; v2(102.8,82) 102.85,82.05 U1.47 ; v1(103.1,85.2) 103.15,85.25 103.9,85.25 C2.2 ; v1(103.1,88.5) 103.5,88.1 C3.2 ; C6.2 103.873,73.677 104.223,73.677 v1(104.3,73.6) ; v1(105.4,87.4) Y1.4 ; C5.2 106.15,83.05 106.423,83.323 106.623,83.323 v1(106.7,83.4) ; C9.2 106.7,83.75 v1(106.7,83.4) ; D2.1 107.183,52.167 107.633,52.167 v1(107.7,52.1) ; R6.2 106.961,82.7 106.844,82.817 106.844,83.148 106.7,83.292 v1(106.7,83.4) ; Y1.2 v1(108.9,86.2)
  Top Layer w0.5: J4.5 v1(109.233,68.14)
  Bottom Layer w0.5: J2.14 J2.15
  other v1: 88,52 90,52 92,52 94,52 110,52 112,52 89,54 105,54 109,54 111,54 113,54 84,56 86,56 88,56 90,56 110,56 112,56 114,56 116,56 85,58 87,58 89,58 95,58 97,58 99,58 103,58 105,58 107,58 109,58 111,58 113,58 115,58 117,58 84,60 86,60 88,60 94,60 96,60 98,60 104,60 106,60 108,60 110,60 112,60 114,60 116,60 85,62 93,62 95,62 99,62 103,62 117,62 111.3,63.7 84,64 106,64 104.8,65.1 112.2,65.6 117,66 100,67.3 88,68 94,68 96,68 116,68 89,70 95,70 111,70 117,70 112.2,71.4 104.6,72.3 88.7,72.8 106.6,72.8 93,74 95,74 117,74 110.7,74.3 106.7,75.4 110,76 112,76 116,76 112,78 117,78 89.7,78.7 92,78.7 88.3,79.8 111.3,81.6 117,82 89.8,82.6 112,84 113,86 117,86 112.6,87.9 96,88 116,88 88.9,88.5 93,90 95,90 97,90 111,90 117,90 89.5,90.4 106.8,91.3 109.2,91.3 92,92 94,92 96,92 104,92 91,94 93,94 95,94 105,94 107,94 109,94 111,94 113,94 117,94 88.5,94.2 90,96 92,96 94,96 96,96 106,96 108,96 110,96 112,96 114,96 116,96 89,98 91,98 93,98 95,98 97,98 99,98 103,98 105,98 107,98 109,98 111,98 113,98 117,98 98,100 100,100 102,100 104,100 106,100 108,100 110,100 112,100 114,100 116,100 95.2,100.8 101,102 103,102 105,102 107,102 109,102 111,102 113,102 88,104 108,104 110,104 112,104 98.6,104.2
  other v2: 99.5,77.6 100.6,77.6 101.7,77.6 98.4,78.7 99.5,78.7 100.6,78.7 101.7,78.7 102.8,78.7 98.4,79.8 99.5,79.8 100.6,79.8 101.7,79.8 102.8,79.8 98.4,80.9 99.5,80.9 100.6,80.9 101.7,80.9 102.8,80.9 98.4,82 100.6,82 101.7,82
IMU_CPOUT: C14.1 U2.20 | length 1.5
  Top Layer w0.2: C14.1 99.9,90.1 U2.20
IMU_INT: U1.45 U2.12 | length 22.3
  Top Layer w0.2: v1(98.4,95.8) 98.508,95.8 98.858,95.45 99.325,95.45 99.4,95.375 U2.12 ; U1.45 105.75,81.05 v1(106.3,81.6)
  Bottom Layer w0.2: v1(98.4,95.8) 99.2,95 99.2,91.2 102,88.4 102,85.2 104.4,82.8 105.9,82.8 106.3,82.4 v1(106.3,81.6)
IMU_REGOUT: C12.1 U2.10 | length 1.2
  Top Layer w0.2: U2.10 100.425,95.15 100.425,96.225 C12.1
IMU_SCL: R2.1 U1.42 U2.23 | length 24.9
  Top Layer w0.2: U2.23 101.4,89.7 101.9,89.2 108.4,89.2 109.5,88.1 109.5,82.2 v1(109,81.7) ; U1.42 R2.1@107.8,79.55 ; R2.1 R2.1@107.8,79.55 ; v1(108.3,78.9) 108.223,78.977 108.223,79.327 108,79.55 R2.1@107.8,79.55
  Bottom Layer w0.2: v1(108.3,78.9) 109,79.6 v1(109,81.7)
IMU_SDA: R3.1 U1.43 U2.24 | length 24.6
  Top Layer w0.2: U2.24 101.9,90.507 102.307,90.1 108.8,90.1 110.4,88.5 110.4,81.1 R3.1 108.95,79.7 108.45,80.2 106.892,80.2 106.742,80.05 U1.43
LED_PWR_A: D2.2 R7.2 | length 1.6
  Top Layer w0.3: D2.2 107.1,54.75 R7.2
MCU_BOOT0: J2.11 R6.1 U1.44 | length 13.7
  Top Layer w0.2: U1.44 106.25,80.55 107.4,81.7 R6.1 107.5,81.7 108.8,83 v1(108.8,83.7)
  Bottom Layer w0.2: v1(108.8,83.7) 112.16,87.06 J2.11
MCU_LED_OUT: J2.2 R4.1 U1.26 | length 42.1
  Top Layer w0.2: v1(98.2,71.1) 98.2,71.208 98.1,71.308 98.1,74.8 98.35,75.05 U1.26
  Top Layer w0.3: R4.1 92.8,83.4 v1(93.2,83)
  Bottom Layer w0.2: v1(98.2,71.1) 98.6,70.7 99.2,70.7 103.8,66.1 103.8,64.4 105.5,62.7 113.1,62.7 J2.2
  Bottom Layer w0.3: v1(93.2,83) 97.8,78.4 97.8,71.981 98.143,71.638 98.143,71.157 v1(98.2,71.1)
MCU_NRST: C11.1 J2.13 J4.3 R5.2 U1.7 | length 50.3
  Top Layer w0.2: R5.2 98.683,86.667 98.683,86.217 v1(99,85.9) 99,85.883 99.3,85.583 99.3,85.05 C11.1 100.35,84 U1.7 ; J4.3 108.374,66.87 108.904,67.4 109.877,67.4 v1(109.891,67.414)
  Int1 (GND) w0.2: v1(100.4,88.5) 101.638,89.738 103.838,89.738 v1(104.8,90.7)
  Bottom Layer w0.2: v1(100.4,88.5) 99,87.1 v1(99,85.9) 99,85.2 100.105,84.095 101.639,84.095 103.367,82.367 103.367,77.333 106.1,74.6 108.6,74.6 109.891,73.309 v1(109.891,67.414) ; v1(104.8,90.7) 106.24,92.14 J2.13
MCU_OSC_IN: R1.2 U1.5 | length 3.1
  Top Layer w0.2: U1.5 101.35,85.6 R1.2
MCU_OSC_OUT: C3.1 U1.6 Y1.3 | length 11.1
  Top Layer w0.2: U1.6 100.85,86.074 102.076,87.3 104.4,87.3 105.225,88.125 107.05,88.125 107.775,87.4 Y1.3
MCU_PA0: J1.1 U1.10 | length 20.1
  Top Layer w0.2: J1.1 89.3,94.52 89.3,91.751 96.651,84.4 98.4,84.4 98.85,83.95 U1.10
MCU_PA2: J1.3 U1.12 | length 15.4
  Top Layer w0.2: J1.3 90.56,88.18 91.72,88.18 95.126,84.774 95.126,83.974 95.85,83.25 97.827,83.25 97.85,83.227 U1.12
MCU_PA3: J1.4 U1.13 | length 14.3
  Top Layer w0.2: J1.4 89.4,86.8 89.4,85.5 91,83.9 94.508,83.9 95.858,82.55 U1.13
MCU_PA4: J1.5 U1.14 | length 12.7
  Top Layer w0.2: J1.5 91.61,82.05 U1.14
MCU_PA5: J1.6 U1.15 | length 11.8
  Top Layer w0.2: J1.6 89.57,81.55 U1.15
MCU_PA6: J1.7 U1.16 | length 11
  Top Layer w0.2: J1.7 87.53,81.05 U1.16
MCU_PA7: J1.8 U1.17 | length 11.1
  Top Layer w0.2: J1.8 87.71,80.55 U1.17
MCU_PA8: J2.5 U1.29 | length 24.1
  Top Layer w0.2: v1(99.7,72.9) 99.7,73.008 99.5,73.208 99.5,74.314 99.85,74.664 U1.29
  Bottom Layer w0.2: v1(99.7,72.9) 99.7,72.851 100.228,72.323 102.177,72.323 107.686,66.814 111.014,66.814 112.282,68.082 112.282,69.502 J2.5
MCU_PA9: J2.6 U1.30 | length 19.4
  Top Layer w0.2: U1.30 100.35,74.599 99.9,74.149 99.9,73.549 100.5,72.949 v1(100.5,72.923) ; v1(108.6,72.5) 112.74,72.5 J2.6
  Bottom Layer w0.2: v1(100.5,72.923) 100.523,72.9 104.946,72.9 105.846,72 108.1,72 v1(108.6,72.5)
MCU_PA10: J2.7 U1.31 | length 18.7
  Top Layer w0.2: v1(100.5,73.9) 100.5,74.008 100.85,74.358 U1.31 ; v1(108.6,73.5) 111.2,73.5 J2.7
  Bottom Layer w0.2: v1(100.5,73.9) 101.978,73.9 102.378,74.3 104.685,74.3 105.485,73.5 v1(108.6,73.5)
MCU_PA15: J2.8 U1.38 | length 11.9
  Top Layer w0.2: U1.38 105.46,77.55 105.91,77.1 v1(105.91,77.01)
  Bottom Layer w0.2: v1(105.91,77.01) 106.52,77.01 106.61,77.1 112.26,77.1 J2.8
MCU_PB0: J1.9 U1.18 | length 11.9
  Top Layer w0.2: J1.9 89.75,80.05 U1.18
MCU_PB1: J1.10 U1.19 | length 12.7
  Top Layer w0.2: J1.10 91.79,79.55 U1.19
MCU_PB2: J1.11 U1.20 | length 13.9
  Top Layer w0.2: J1.11 86.862,72.082 86.862,72.562 93.35,79.05 U1.20
MCU_PB4: J2.9 U1.40 | length 13
  Top Layer w0.2: U1.40 106.95,78.55 108.1,77.4 110.02,77.4 J2.9
MCU_PB5: J2.10 U1.41 | length 14.2
  Top Layer w0.2: U1.41 107.15,79.05 108.1,78.1 109.1,78.1 114.338,83.338 114.338,84.258 J2.10
MCU_PB9: J2.12 U1.46 | length 16.5
  Top Layer w0.2: U1.46 104.642,81.55 104.792,81.7 v1(104.9,81.7)
  Bottom Layer w0.2: v1(104.9,81.7) 104.924,81.676 104.924,81.276 105.6,80.6 106.6,80.6 107.9,81.9 107.9,84.3 113.115,89.515 114.515,89.515 J2.12
MCU_PB10: J1.12 U1.21 | length 15.3
  Top Layer w0.2: J1.12 90.432,73.112 90.432,74.532 94.45,78.55 U1.21
MCU_PB12: J2.1 U1.25 | length 27.7
  Top Layer w0.2: v1(97.4,71.1) 97.4,71.896 97.7,72.196 97.7,74.966 97.85,75.116 U1.25
  Bottom Layer w0.2: v1(97.4,71.1) 97.4,71.051 102.7,65.751 102.7,63.9 104.94,61.66 J2.1
MCU_PB14: J2.3 U1.27 | length 24.4
  Top Layer w0.2: v1(98.7,72) 98.7,72.108 98.5,72.308 98.5,74.634 98.85,74.984 U1.27
  Bottom Layer w0.2: v1(98.7,72) 98.7,71.951 99.351,71.3 100.2,71.3 106.1,65.4 108.3,65.4 109,64.7 112.56,64.7 J2.3
MCU_PB15: J2.4 U1.28 | length 23.6
  Top Layer w0.2: U1.28 99.35,74.73 98.9,74.28 98.9,72.649 99.5,72.049 v1(99.5,72)
  Bottom Layer w0.2: v1(99.5,72) 99.577,71.923 101.077,71.923 106.8,66.2 111.52,66.2 J2.4
MCU_SWCLK: J4.4 U1.37 | length 11.8
  Top Layer w0.2: U1.37 104.55,77.05 105.601,75.999 105.601,68.299 J4.4
MCU_SWDIO: J4.2 U1.34 | length 12.7
  Top Layer w0.2: U1.34 102.35,75.85 102.7,75.5 102.7,73.251 104.5,71.451 104.5,68.13 J4.2
MCU_SWO: J4.6 U1.39 | length 12.9
  Top Layer w0.2: U1.39 106.05,78.05 107.7,76.4 107.7,68.969 107.03,68.299 J4.6
MCU_VCAP1: C10.1 U1.22 | length 2.2
  Top Layer w0.2: 96.64,78.04 97.19,78.04 U1.22
  Top Layer w0.3: 96.34,78.04 96.64,78.04
  Top Layer w0.35: 96.05,77.75 96.34,78.04
  Top Layer w0.4: C10.1 96.05,77.1 96.05,77.75
USB_D_N: D5.1 J3.2 U1.32 | length 22.5
  Top Layer w0.295: J3.2 100.015,54.662 100.015,55.475 100.651,56.11 100.651,56.898 100.548,57 100.651,57.102 100.651,66.359 101.351,67.059 U1.32@101.351,76.399
USB_D_P: D4.1 J3.3 U1.33 | length 22.3
  Top Layer w0.295: J3.3 100.641,54.639 100.641,55.396 101.149,55.904 101.149,56.898 101.252,57 D4.1 ; D4.1@101.149,57.104 101.149,66.153 101.849,66.853 U1.33@101.849,76.399
USER_LED_A: D1.2 R4.2 | length 1.7
  Top Layer w0.3: R4.2 92.25,84.4 92.35,84.5 D1.2
V_DIV: R8.2 R9.1 U1.11 | length 23.5
  Top Layer w0.2: R8.2 v1(92,70.5) ; v1(96.3,83.9) 97.955,83.9 98.225,83.63 98.225,83.614 98.35,83.489 U1.11
  Top Layer w0.3: R9.1 R8.2
  Bottom Layer w0.2: v1(92,70.5) 92,76.354 91,77.354 91,83.1 91.8,83.9 v1(96.3,83.9)
VBUS: C18.1 D3.2 FB1.1 J3.1
XTAL_IN: C2.1 R1.1 Y1.1 | length 3.6
  Top Layer w0.2: R1.1 106.225,86.1 Y1.1
pads on no net: J3.4 J3.6 J3.7 J3.8 J3.9 J3.10 J3.11 J4.A J4.B J4.C U1.2 U1.3 U1.4 U2.2 U2.3 U2.4 U2.5 U2.6 U2.7 U2.14 U2.15 U2.16 U2.17 U2.19 U2.21 U2.22

## Polygon pours and split planes (outlines as drawn)
GND on Top Layer "GND_L01_P012" (solid, pour order 12): 82.4,53.5 82.4,103.5 cw(c85.6,103.5) 85.6,106.7 115.6,106.7 cw(c115.6,103.5) 118.8,103.5 118.8,53.5 cw(c115.6,53.5) 115.6,50.3 85.6,50.3 cw(c85.6,53.5)
VBUS on Top Layer "VBUS_L01_P000" (solid, pour order 0): 99.062,53.895 99.063,53.895 99.512,53.895 99.512,55.429 ccw(c98.888,55.429) 99.329,55.871 98.471,56.729 ccw(c98.059,56.317) 98.059,56.9 96.741,56.9 ccw(c96.741,56.16) 96.218,56.683 95.946,56.411 ccw(c96.298,56.059) 95.8,56.059 95.8,54.841 cw(c95.218,54.841) 95.629,54.429 95.571,54.371 cw(c95.159,54.783) 95.159,54.2 93.141,54.2 ccw(c93.141,53.618) 92.729,54.029 92.671,53.971 ccw(c92.962,53.679) 92.55,53.679 92.55,52.65 ccw(c92.65,52.65) 92.65,52.55 94.979,52.55 ccw(c94.979,52.878) 95.211,52.646 96.954,54.389 ccw(c96.601,54.741) 97.1,54.741 97.1,55.159 cw(c97.653,55.159) 97.262,55.549 cw(c97.625,55.186) 97.626,55.7 98.359,55.7 cw(c98.359,55.117) 98.771,55.529 98.929,55.371 cw(c98.608,55.049) 99.062,55.049
+3V3 on Top Layer "+3V3_L01_P010" (solid, pour order 10): 90.5,63.5 91.459,63.5 cw(c91.459,62.676) 92.041,63.259 92.388,62.912 ccw(c93.383,63.907) 93.383,62.5 98.7,62.5 ccw(c98.7,62.8) 99,62.8 99,65.8 ccw(c98.7,65.8) 98.7,66.1 93.141,66.1 ccw(c93.141,65.276) 92.559,65.859 92.041,65.341 cw(c91.459,65.924) 91.459,65.1 90.5,65.1 ccw(c90.5,64.8) 90.2,64.8 90.2,63.8 ccw(c90.5,63.8)
+5V on Top Layer "+5V_L01_P005" (solid, pour order 5): 90.1,61.509 90.1,62.4 cw(c90.4,62.4) 90.4,62.7 91.8,62.7 cw(c91.8,62.199) 92.301,62.199 92.301,58.5 cw(c92.202,58.5) 92.201,58.4 91.2,58.4 cw(c91.2,58.5) 91.1,58.5 91.1,61.1 ccw(c91,61.1) 91,61.2 90.409,61.2 cw(c90.409,61.509)
GND on Int1 (GND) "GND_L02_P001" (solid, pour order 1): 82.4,53.5 82.4,103.5 cw(c85.6,103.5) 85.6,106.7 115.6,106.7 cw(c115.6,103.5) 118.8,103.5 118.8,53.5 cw(c115.6,53.5) 115.6,50.3 85.6,50.3 cw(c85.6,53.5)
GND on Bottom Layer "GND_L04_P003" (solid, pour order 3): 82.4,53.5 82.4,103.5 cw(c85.6,103.5) 85.6,106.7 115.6,106.7 cw(c115.6,103.5) 118.8,103.5 118.8,53.5 cw(c115.6,53.5) 115.6,50.3 85.6,50.3 cw(c85.6,53.5)
+3V3 on Int2 (PWR) "+3V3_L03_P002" (solid, pour order 2): 82.4,53.5 82.4,103.5 cw(c85.6,103.5) 85.6,106.7 115.6,106.7 cw(c115.6,103.5) 118.8,103.5 118.8,53.5 cw(c115.6,53.5) 115.6,50.3 85.6,50.3 cw(c85.6,53.5)

## Other copper
Top Layer:
  region: 91.683,104.665 91.686,105.646 91.692,105.651 91.699,105.655 91.708,105.667 91.715,105.671 91.719,105.678 91.724,105.684 91.739,105.688 91.75,105.684 91.796,105.686 91.807,105.678 91.81,105.671 91.816,105.666 91.821,105.664 91.825,105.657 91.834,105.647 91.839,105.646 91.843,105.631 91.839,105.616 91.841,103.299 91.832,103.287 91.825,103.283 91.821,103.276 91.816,103.27 91.808,103.267 91.799,103.254 91.728,103.252 91.719,103.258 91.715,103.265 91.683,103.298 91.683,104.661
  region: 92.7,104.453 92.698,105.64 92.702,105.647 92.709,105.651 92.718,105.66 92.72,105.666 92.727,105.669 92.736,105.678 92.738,105.684 92.753,105.688 92.764,105.684 92.809,105.686 92.822,105.677 92.826,105.669 92.833,105.666 92.838,105.66 92.842,105.653 92.855,105.644 92.857,103.298 92.851,103.289 92.844,103.285 92.82,103.261 92.818,103.256 92.804,103.252 92.738,103.256 92.733,103.261 92.729,103.268 92.716,103.278 92.712,103.285 92.705,103.289 92.7,103.294 92.696,103.309 92.7,103.32 92.7,104.45
  region: 89.145,103.622 89.149,105.646 89.154,105.651 89.161,105.655 89.171,105.667 89.178,105.671 89.182,105.678 89.187,105.684 89.202,105.688 89.212,105.684 89.258,105.686 89.269,105.678 89.273,105.671 89.278,105.666 89.284,105.664 89.287,105.657 89.296,105.647 89.302,105.646 89.305,105.631 89.302,105.616 89.304,103.037 89.295,103.024 89.287,103.021 89.284,103.013 89.278,103.008 89.271,103.004 89.262,102.991 89.191,102.99 89.182,102.995 89.178,103.002 89.145,103.035 89.145,103.618
  region: 452 vertices and 0 holes, not listed, extent 88.883,101.976 93.87,105.177
  region: 649 vertices and 2 holes, not listed, extent 88.132,102.239 94.607,105.914

## Silkscreen, mask and mechanical layers (free items; w line width, h text height)
Top Overlay:
  circle w0.254: c115.6,53.5 r2
  circle w0.254: c85.6,53.5 r2
  circle w0.254: c85.6,103.5 r2
  circle w0.254: c115.6,103.5 r2
  circle w0.75: c111.4,93.2 r0.4
  lines w0.254: 89.8,87.808 ccw(c90.308,87.808) 90.308,87.3 92.992,87.3 ccw(c92.992,87.808) 93.5,87.808 93.5,88.892 ccw(c92.992,88.892) 92.992,89.4 90.308,89.4 ccw(c90.308,88.892) 89.8,88.892 89.8,87.808 ; 108,53.008 ccw(c108.508,53.008) 108.508,52.5 111.192,52.5 ccw(c111.192,53.008) 111.7,53.008 111.7,54.092 ccw(c111.192,54.092) 111.192,54.6 108.508,54.6 ccw(c108.508,54.092) 108,54.092 108,53.008
  lines w0.5: 108.4,93.2 108.9,92.7 108.9,93.7 108.4,93.2 ; 108.4,93.2 111.4,93.2 111.4,90.2 ; 111.4,90.2 110.9,90.7 111.9,90.7 111.4,90.2
  text "5V" at 95.767,101.35 h1
  text "3V3" at 99.267,101.35 h1
  text "GND" at 103.267,101.35 h1
  text "A0" at 82.65,96.85 h0.8
  text "GND" at 116.45,96.85 h0.8
  text "GND" at 116.45,94.35 h0.8
  text "GND" at 82.65,94.25 h0.8
  text "+X" at 106.25,92.75 h1
  text "A2" at 82.65,91.75 h0.8
  text "RST" at 116.45,91.75 h0.8
  text "B9" at 116.45,89.25 h0.8
  text "A3" at 82.65,89.15 h0.8
  text "+Y" at 110.45,88.55 h1
  text "LED" at 90.2,87.7 h1
  text "A4" at 82.65,86.75 h0.8
  text "BT0" at 116.45,86.65 h0.8
  text "A5" at 82.65,84.15 h0.8
  text "B5" at 116.45,84.15 h0.8
  text "A6" at 82.65,81.65 h0.8
  text "B4" at 116.45,81.55 h0.8
  text "A7" at 82.65,79.05 h0.8
  text "A15" at 116.45,79.05 h0.8
  text "A10" at 116.45,76.55 h0.8
  text "B0" at 82.65,76.45 h0.8
  text "B1" at 82.65,73.95 h0.8
  text "A9" at 116.45,73.95 h0.8
  text "B2" at 82.65,71.45 h0.8
  text "A8" at 116.45,71.45 h0.8
  text "PROG" at 105.832,70.55 h1
  text "B15" at 116.45,68.95 h0.8
  text "B10" at 82.65,68.85 h0.8
  text "3V3" at 82.65,66.35 h0.8
  text "B14" at 116.45,66.35 h0.8
  text "5V" at 82.65,63.85 h0.8
  text "B13" at 116.45,63.75 h0.8
  text "GND" at 82.65,61.25 h0.8
  text "B12" at 117.85,60.55 h0.8 r90
  text "PWR" at 108.4,52.9 h1
Bottom Overlay:
  drawing of 9 lines, arcs and shapes, not listed
  text "STM32F4 Berkware Dev. Board V1 / Revision 1 / Issue Date: Nov 2026" at 88.2,55.6 h1.52 r270
Mechanical 1:
  the board outline again, w0.254